# Altium PCB Analog_Project_Channels.PcbDoc (part 2 of 2)
Units mil, origin at the board's own origin, x right, y up, seen from the top; angles counter-clockwise.
Board outline 5930 x 2510 mil, 2 copper layers (Top Layer, Bottom Layer); 96 components, 61 nets, 270 pads, 10 vias.
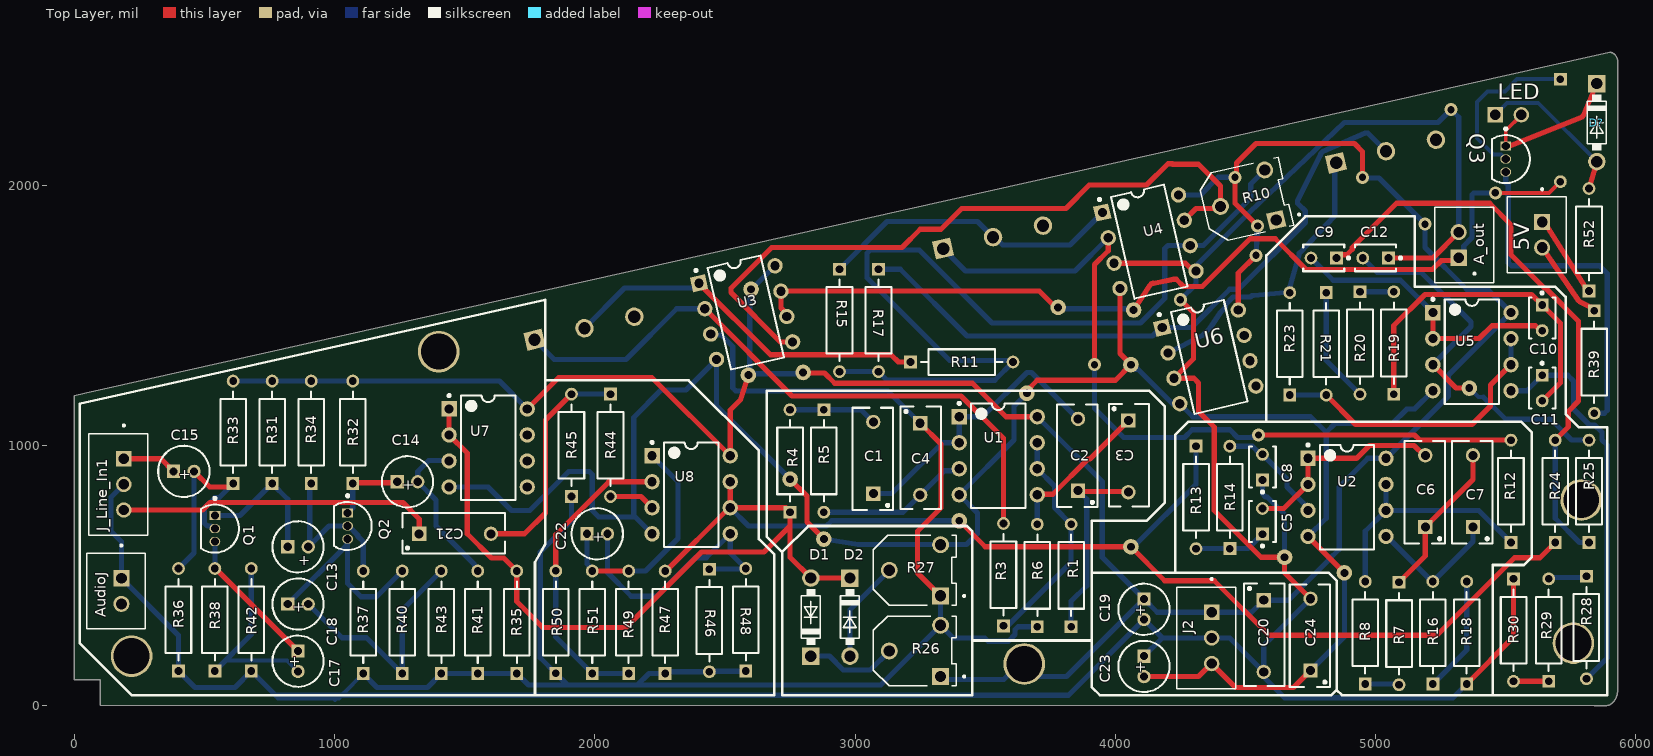
[diagram p0: Top Layer view]

## Via types
v1: diameter 50, hole 28, Top Layer to Bottom Layer, 10 vias

## Nets (pads, with @x,y where several pads share a name; then routed paths per layer and width w, separated by ;. In a path a pad name is that pad's centre, name@x,y a point inside that pad or via, vN(x,y) a via of type N, cw(c..) or ccw(c..) an arc to the next point about the centre after c; other vN are vias at no path point) (continued)
NetR2_1: (continued)
  Bottom Layer w20: R2.1 1843.91,1330 2120,1330 2314.98,1524.98 U3.2
NetR2_2: R2.2 R11.1 U3.1 | length 1449.8
  Top Layer w20: U3.1 2674.46,1348.06 3138.06,1348.06 3166.12,1320 R11.1
  Bottom Layer w20: R2.2 2114.43,1604.43 2382.12,1604.43 U3.1
NetR7_2: R7.2 R8.1 | length 130
  Bottom Layer w20: R8.1 R7.2@5090,83.15
NetR8_2: R8.2 R12.1 U2.6 U2.7 | length 937.5
  Bottom Layer w20: R8.2 4960,670 U2.6 ; U2.7 U2.6 ; R12.1 5396.3,750 U2.6
NetR9_1: R9.1 R12.2 U4.2 | length 3093.5
  Top Layer w20: v1@3920,1300 3920,1694.8 3972.7,1747.5 U4.2 ; v1(4550,1040) 5149.49,1040 5169.49,1020 R12.2
  Bottom Layer w20: R9.1 3423.91,1670 3845.31,1670 U4.2 ; v1(3920,1310) 3920,1142.31 4032.31,1030 4265.65,1030 4295.65,1060 4439.93,1060 4469.93,1030 4523.28,1030 4527.54,1034.26 4544.26,1034.26 v1(4550,1040)
NetR9_2: R9.2 R15.1 U4.1 | length 1175.1
  Bottom Layer w20: R15.1 3123.15,1860 3470,1860 R9.2 3537.15,1800 3567.15,1770 3825.38,1770 U4.1
NetR10_2: R10.2 U3.5 U4.7 | length 2685.1
  Top Layer w20: U3.5 2712.41,1397.59 2523.28,1586.72 2523.28,1603.28 2680,1760 3180,1760 3250,1830 3330,1830 3410,1910 3810,1910 3900,2000 4120,2000 4201.72,2081.72 4218.28,2081.72 4220,2080 4320,2080 4404.1,1995.9 4404.1,1926.46 R10.2 4396.24,1910 4310.14,1910 U4.7
NetR10_3: R10.3 R11.2 R15.2 R17.2 U4.6 | length 3536.6
  Bottom Layer w20: R15.2 R17.2 3123.1,1250.05 3201.19,1250.05 3201.24,1250 3536.85,1250 R11.2 3601.32,1325.53 3363.82,1325.53 3045.39,1643.96 3045.39,1738.28 3057.11,1750 3246.58,1750 3526.58,1470 4096.36,1470 4190,1563.64 4190,1755.72 4201.72,1767.44 4337.44,1767.44 4520,1950 4520,2004.28 R10.3
NetR16_1: R16.1 R18.2 | length 447.5
  Bottom Layer w20: R16.1 5350,213.15 R18.2
NetR17_1: R17.1 R22.2 U6.1 | length 2518.7
  Bottom Layer w20: R17.1 3173.15,1676.85 3430,1420 4142.97,1420 U6.1@4175.39,1452.41 ; U6.1 4292.46,1452.41 4439.47,1599.43 4473.07,1599.43 4730,1856.36 4730,1900 4703.44,1926.56 4700,1930 4700,1939.73 4787.83,2114.59 4787.83,2119.68 4796.68,2128.54 4960.27,2200 4970,2200 R22.2
NetR19_2: R19.2 R20.1 | length 130
  Bottom Layer w20: R20.1 R19.2
NetR20_2: R20.2 R21.1 | length 444.4
  Bottom Layer w20: R21.1 4810,1326.3 R20.2
NetR21_2: R21.2 R23.1 U5.6 U5.7 | length 1139
  Top Layer w20: R21.2 4923.15,1080 5370,1080 5441.26,1151.26 5441.26,1231.26 U5.6
  Bottom Layer w20: R23.1 R21.2 ; U5.6 U5.7
NetR22_1: R22.1 R23.2 U6.2 | length 1120.1
  Bottom Layer w20: U6.2 4335.15,1422.41 4364.44,1451.7 4402.46,1509.41 cw(c4419.16,1498.41) 4405.02,1512.55 4422.89,1530.42 4422.89,1540.41 4451.9,1569.43 4517.78,1569.43 4518.86,1570.51 cw(c4533,1556.36) 4531.23,1576.28 ; 4531.28,1576.29 4653.43,1586.85 R23.2 4670,1603.42 4706.97,1738.48 4843.22,1883.22 4843.22,2080.75 R22.1
NetR28_1: R28.1 R29.2 | length 149.1
  Bottom Layer w20: R29.2 5670,491.85 5805,491.85 R28.1
NetR29_1: R29.1 R30.2 | length 135
  Top Layer w20: R30.2 R29.1
NetR44_2: R44.2 U8.3 | length 177.9
  Top Layer w20: R44.2 2176.85,803.15 U8.3
NetR49_1: R49.1 R50.2 R51.1 U8.2 | length 1185.5
  Top Layer w20: R50.2 1850,656.23 2053.77,860 U8.2
  Bottom Layer w20: R50.2 1850,263.15 R51.1 R49.1
pads on no net: AudioJ.2 R2.3 R9.3 R10.1 R22.3 U6.5 U6.6 U6.7 U7.5 U7.6 U7.7

## Silkscreen, mask and mechanical layers (free items; w line width, h text height)
Top Overlay:
  lines w10: 1810,1300 1810,1250 2360,1250 2630,980 2630,860 2630,640 2690,580 2690,40 1770,40 ; 3450,190 3450,240 ; 3450,250 3910,250 3910,710 4120,710 4190,780 4190,1150 4130,1210 2660,1210 2660,650 2720,590 ; 3910,290 3910,70 3940,40 4830,40 4850,60 ; 3910,510 4820,510 4850,480 4850,60 ; 4230,510 4230,1040 4280,1090 5560,1090 5600,1050 5600,690 5600,665 5600,615 5600,570 5570,540 5450,540 5450,490 5450,40 ; 4580,1090 4580,1730 4730,1880 5150,1880 5150,1610 5690,1610 5730,1570 5730,1120 5780,1070 5890,1070 5890,40 5450,40 ; 1770,40 220,40 20,240 20,1160 1810,1560 1810,1440 1810,620 1770,550 1770,40 ; 2720,590 2820,690 3430,690 3450,670 3450,40 2720,40 2720,590 ; 4850,60 4870,40 5450,40
Bottom Overlay:
  drawing of 83 lines, arcs and shapes, not listed
Mechanical 1:
  lines w10: 0,100 17.57,100 100,100 100,45.86 100,1.72 5840,0 5885.86,0 ccw(c5885.86,34.14) 5910,10 ccw(c5861.72,58.28) 5930,58.28 5930,2475.86 ccw(c5895.86,2475.86) 5920,2500 5917.07,2502.93 ccw(c5900,2485.86) 5900,2510 40,1200 0,1190 0,100

## Text inside footprints (layer, text, board x,y; h text height)
C13: Top Overlay "+" at 860,540 h40
C14: Top Overlay "+" at 1260,830 h40
C15: Top Overlay "+" at 400.63,870 h40
C17: Top Overlay "+" at 829.37,190.63 h40 r270
C18: Top Overlay "+" at 839.37,360 h40
C19: Top Overlay "+" at 4080,390 h40 r270
C22: Top Overlay "+" at 1989.37,630 h40
C23: Top Overlay "+" at 4080,170.63 h40 r270
R2: Mechanical 13 "PCB Edge" at 1948.07,1560.14 h35.43 r193
R9: Mechanical 13 "PCB Edge" at 3518.07,1910.14 h35.43 r193
R22: Mechanical 13 "PCB Edge" at 5028.07,2240.14 h35.43 r193